# Altium PCB Keyboard_V0.1.PcbDoc (part 3 of 4)
Units mil, origin at the board's own origin, x right, y up, seen from the top; angles counter-clockwise.
Board outline 5480.32 x 4193.11 mil, 2 copper layers (Top Layer, Bottom Layer); 162 components, 142 nets, 755 pads, 487 vias.
Unrouted connection lines stored in the file: 1.
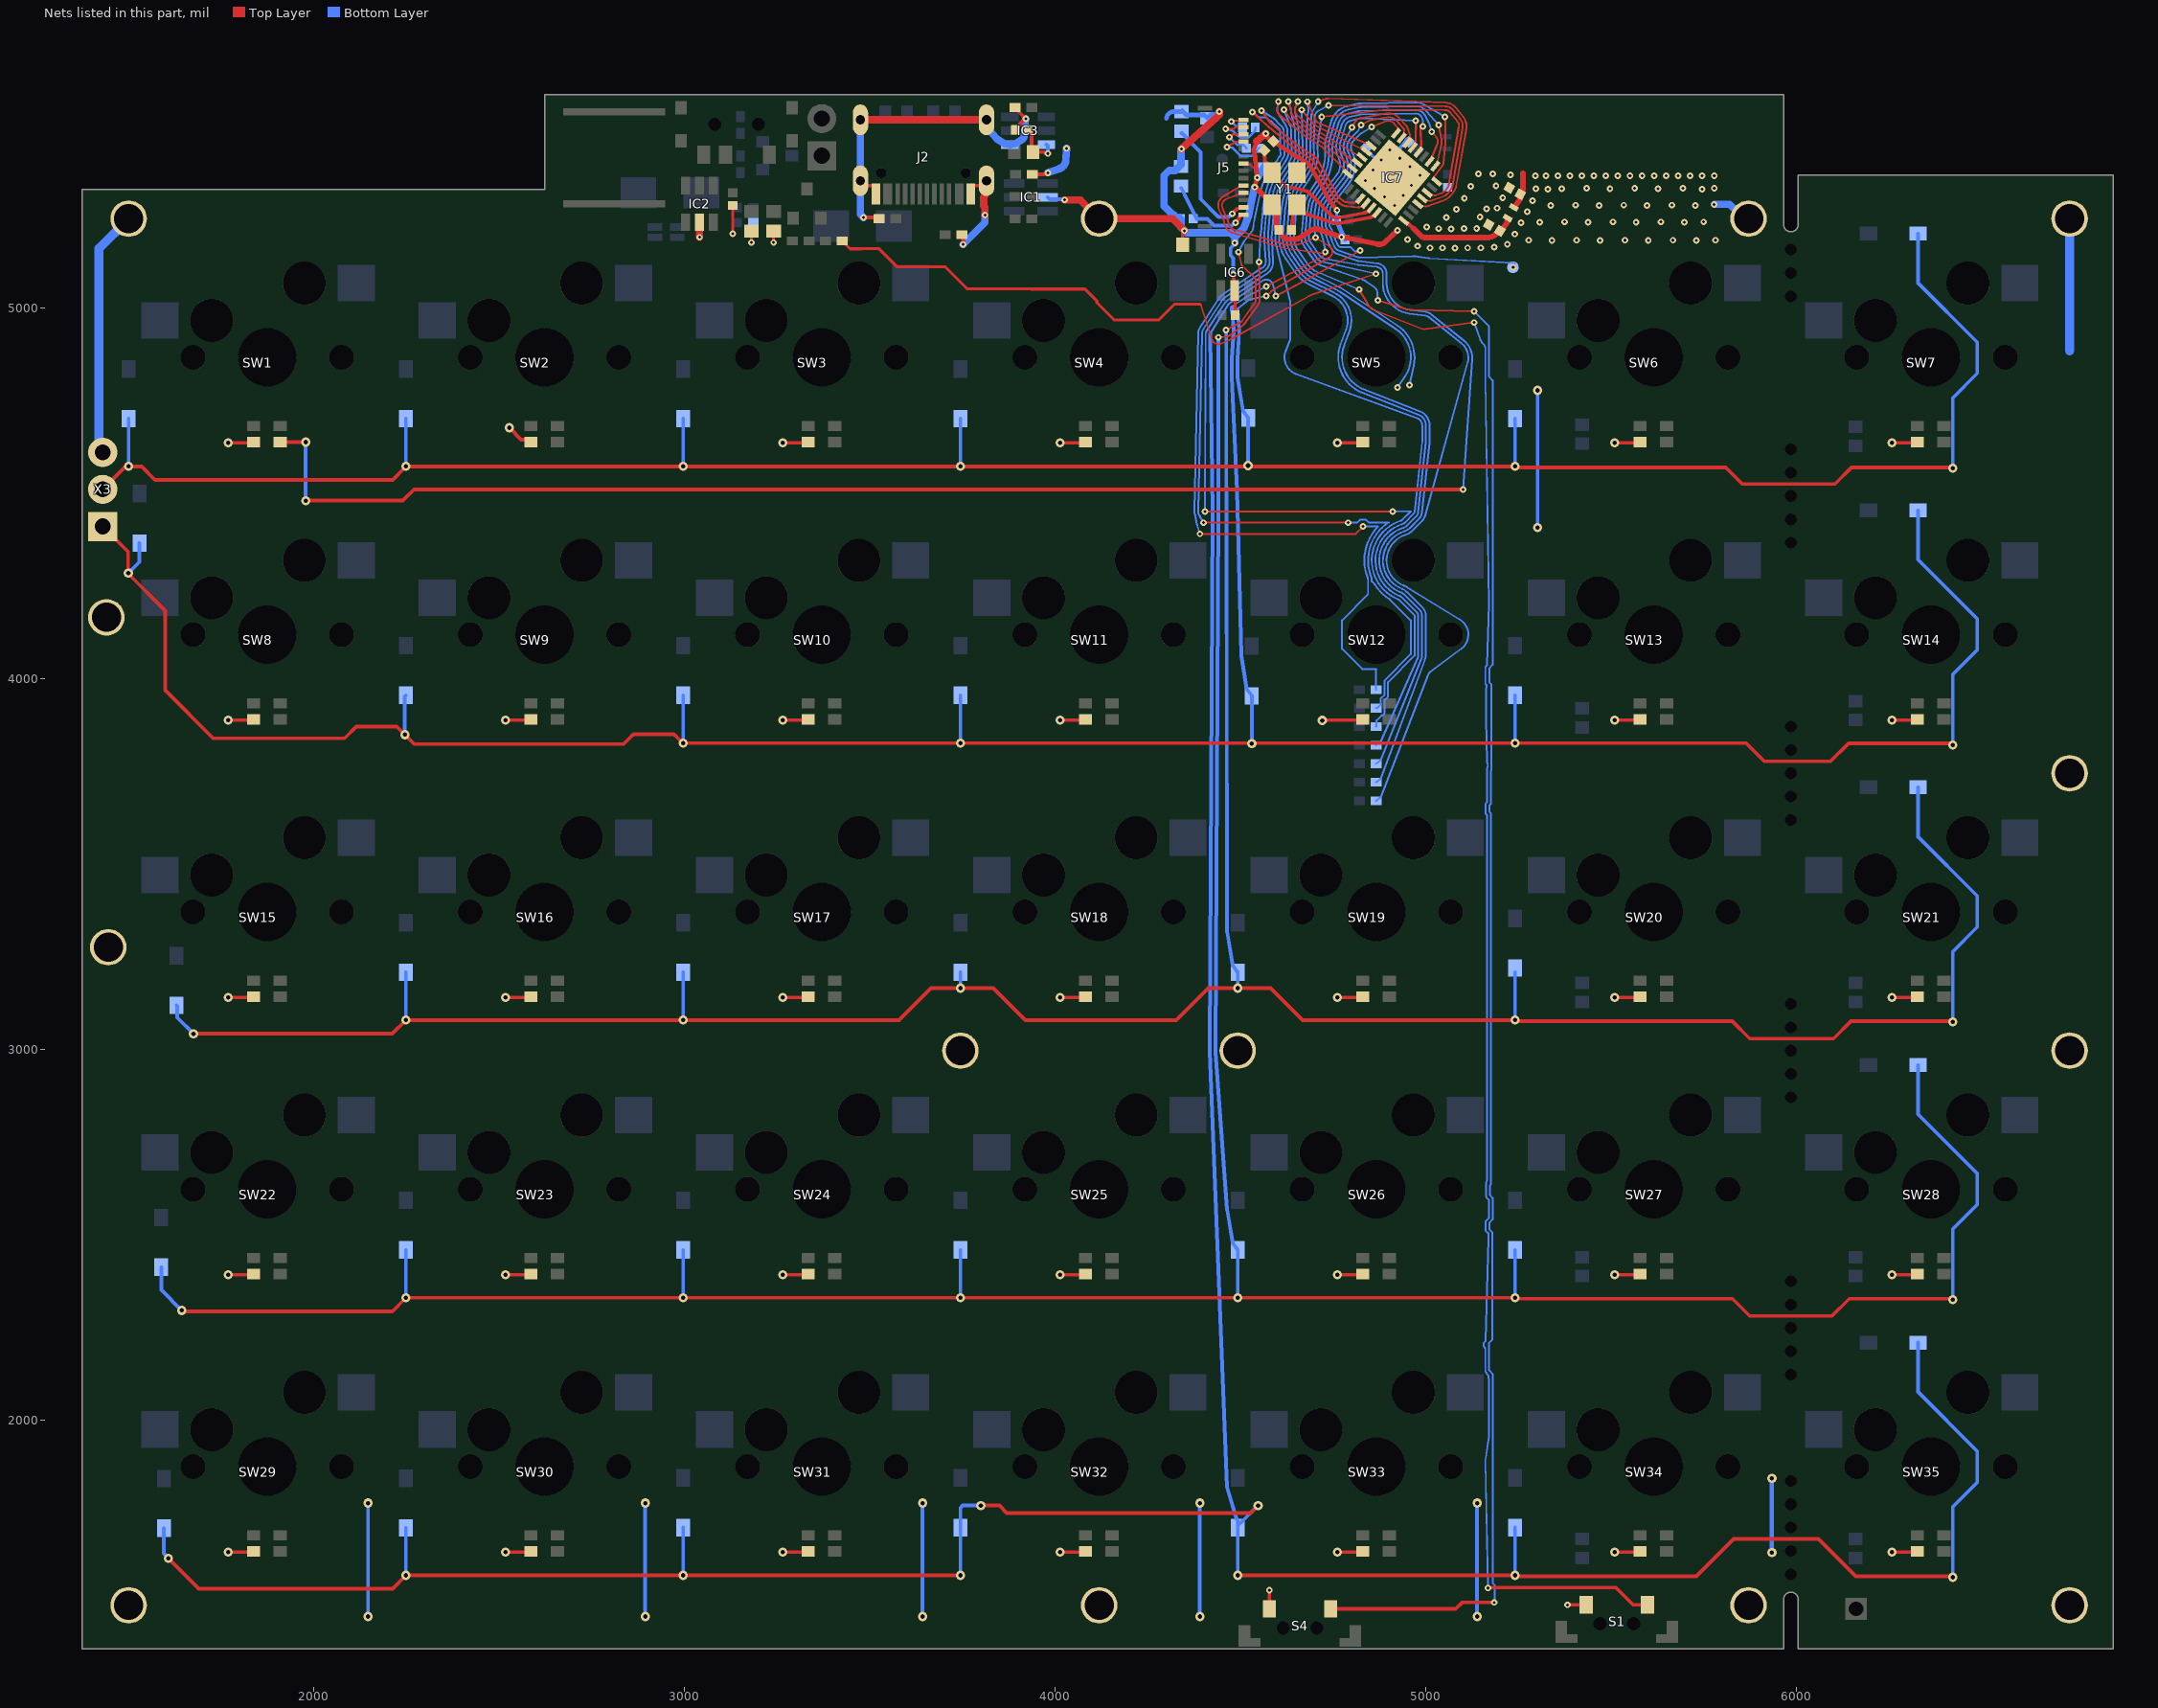
[diagram p2: the nets of this part, all layers, seen from the top]

## Via types
v1: diameter 25, hole 12, Top Layer to Bottom Layer, tented both sides, 244 vias
v2: diameter 17.72, hole 7.87, Top Layer to Bottom Layer, tented both sides, 242 vias
v3: diameter 17.72, hole 7.87, Top Layer to Bottom Layer, 1 vias

## Nets (pads, with @x,y where several pads share a name; then routed paths per layer and width w, separated by ;. In a path a pad name is that pad's centre, name@x,y a point inside that pad or via, vN(x,y) a via of type N, cw(c..) or ccw(c..) an arc to the next point about the centre after c; other vN are vias at no path point) (continued)
GND: C2.1 C3.1 C4.1 C5.1 C6.1 C7.1 C10.1 C11.1 C12.1 C13.1 C14.2 C15.2 C16.1 C17.1 C18.1 C19.1 C20.1 C21.1 C23.1 IC1.2 IC2.2 IC3.1 IC6.2 IC7.33 J2.A1B12 J2.B1A12 J2.S1 J2.S2 J2.S3 J2.S4 J5.7 MH1.0 MH2.0 MH3.0 MH4.0 MH5.0 MH6.0 MH7.0 MH8.0 MH9.0 MH10.0 MH11.0 MH12.0 MH13.0 MH14.0 R6.2 R20.1 R22.1 R23.2 R24.2 R26.1 S1.1 S4.1 SW1.2 SW2.2 SW3.2 SW4.2 SW5.2 SW6.2 SW7.2 SW8.2 SW9.2 SW10.2 SW11.2 SW12.2 SW13.2 SW14.2 SW15.2 SW16.2 SW17.2 SW18.2 SW19.2 SW20.2 SW21.2 SW22.2 SW23.2 SW24.2 SW25.2 SW26.2 SW27.2 SW28.2 SW29.2 SW30.2 SW31.2 SW32.2 SW33.2 SW34.2 SW35.2 X3.3 Y1.2 Y1.4 | length 10152.6
  Top Layer w6: J5.7@4507.87,5388.78 4510.3,5386.35 4525.86,5386.35 4541.4,5370.81
  Top Layer w8: v2(3130,5200) C2.1@3130,5270 ; v2(3180,5175.75) C3.1@3180,5206.85 ; v2(3240,5175.78) C4.1@3240,5206.85 ; C7.1@4343.43,5170 4343.43,5200.2 ; IC6.2@4484,5046.79 4484.65,5023.23 C6.1@4484.65,4980
  Top Layer w10: v1(1768.9,1643.47) 1835,1643.47 SW29.2@1836.93,1645.4 ; v1(1768.9,2391.5) 1835,2391.5 SW22.2@1836.93,2393.43 ; v1(1768.9,3139.53) 1835,3139.53 SW15.2@1836.93,3141.46 ; v1(1768.9,3887.56) 1835,3887.56 SW8.2@1836.93,3889.49 ; v1(1768.9,4635.59) 1835,4635.59 SW1.2@1836.93,4637.52 ; v1(2516.93,1643.47) 2583.03,1643.47 SW30.2@2584.96,1645.4 ; v1(2516.93,2391.5) 2583.03,2391.5 SW23.2@2584.96,2393.43 ; v1(2516.93,3139.53) 2583.03,3139.53 SW16.2@2584.96,3141.46 ; v1(2516.93,3887.56) 2583.03,3887.56 SW9.2@2584.96,3889.49 ; v1(2527.21,4676.13) 2559.03,4644.31 2578.18,4644.31 SW2.2@2584.96,4637.52 ; v1(3264.96,1643.47) 3331.06,1643.47 SW31.2@3332.99,1645.4 ; v1(3264.96,2391.5) 3331.06,2391.5 SW24.2@3332.99,2393.43 ; v1(3264.96,3139.53) 3331.06,3139.53 SW17.2@3332.99,3141.46 ; v1(3264.96,3887.56) 3331.06,3887.56 SW10.2@3332.99,3889.49 ; v1(3264.96,4635.59) 3331.06,4635.59 SW3.2@3332.99,4637.52 ; J2.S2@3473.92,5344.43 3473.92,5343.85 3488.4,5329.38 3509.24,5329.38 3516.05,5322.57 J2.B1A12@3516.05,5308.41 ; v2(3482.65,5243.33) R24.2@3521.47,5243.33 ; v2(3750.95,5170.65) 3750.89,5170.7 3750.89,5199.71 R23.2@3750.95,5199.76 ; J2.A1B12@3771.95,5308.41 3771.95,5322.57 3778.76,5329.38 3799.6,5329.38 J2.S1@3813.41,5343.18 ; R22.1@3882.01,5533.19 R22.1@3888.82,5540 ; R22.1@3891.77,5540 3894.72,5540 3901.54,5533.19 3901.54,5528.46 v2(3920,5510) 3918.06,5510 3904.8,5496.74 3904.8,5494.8 3898.78,5488.78 3898.78,5486.81 C5.1@3891.97,5480 ; R6.2@3941.18,5360 3970,5360 3972.59,5362.59 3978.52,5362.59 v2(3980,5364.06) ; v1(4012.99,1643.47) 4079.09,1643.47 SW32.2@4081.02,1645.4 ; v1(4012.99,2391.5) 4079.09,2391.5 SW25.2@4081.02,2393.43 ; v1(4012.99,3139.53) 4079.09,3139.53 SW18.2@4081.02,3141.46 ; v1(4012.99,3887.56) 4079.09,3887.56 SW11.2@4081.02,3889.49 ; v1(4012.99,4635.59) 4079.09,4635.59 SW4.2@4081.02,4637.52 ; v2(4480,5090) 4481.91,5069.35 IC6.2@4484,5046.79 ; S4.1@4577.32,1490.04 v2(4577.32,1540.66) ; v1(4720,3886.69) 4720.87,3887.56 4827.12,3887.56 SW12.2@4829.06,3889.49 ; v1(4761.02,1643.47) 4827.12,1643.47 SW33.2@4829.06,1645.4 ; v1(4761.02,2391.5) 4827.12,2391.5 SW26.2@4829.06,2393.43 ; v1(4761.02,3139.53) 4827.12,3139.53 SW19.2@4829.06,3141.46 ; v1(4761.02,4635.59) 4827.12,4635.59 SW5.2@4829.06,4637.52 ; v2(5381.43,1501.18) S1.1@5432.05,1501.18 ; v1(5509.06,1643.47) 5575.15,1643.47 SW34.2@5577.09,1645.4 ; v1(5509.06,2391.5) 5575.15,2391.5 SW27.2@5577.09,2393.43 ; v1(5509.06,3139.53) 5575.15,3139.53 SW20.2@5577.09,3141.46 ; v1(5509.06,3887.56) 5575.15,3887.56 SW13.2@5577.09,3889.49 ; v1(5509.06,4635.59) 5575.15,4635.59 SW6.2@5577.09,4637.52 ; v1(6257.09,1643.47) 6323.19,1643.47 SW35.2@6325.12,1645.4 ; v1(6257.09,2391.5) 6323.19,2391.5 SW28.2@6325.12,2393.43 ; v1(6257.09,3139.53) 6323.19,3139.53 SW21.2@6325.12,3141.46 ; v1(6257.09,3887.56) 6323.19,3887.56 SW14.2@6325.12,3889.49 ; v1(6257.09,4635.59) 6323.19,4635.59 SW7.2@6325.12,4637.52
  Top Layer w12: v2(4537.59,5325.41) v2(4544.88,5350.54) ; 4541.4,5370.81 4543.14,5360.68 4539.43,5397.08 cw(c4551.37,5398.25) 4539.37,5398.2 4539.37,5405.87 ccw(c4527.37,5405.87) 4538.98,5408.92 4535.52,5422.09 cw(c4546.16,5424.88) 4535.84,5428.69 4542.19,5445.89 cw(c4553.44,5441.71) 4542.21,5445.94 4543.31,5448.82 ; 4570.22,5460 4582.2,5452.43 C14.2@4587.92,5448.82 4593.53,5445.1 4652.9,5405.71 cw(c4652.34,5393.73) 4658.55,5404 4671.07,5396.43 4681.1,5390.37 cw(c4674.89,5380.1) 4685.24,5386.18 ; 4685.24,5386.17 4709.68,5344.29 cw(c4699.32,5338.24) 4709.85,5343.99 4714.55,5335.39 4730.58,5306.03 ; 4730.59,5306.01 ccw(c4741.11,5311.78) 4730.66,5305.89 4739.75,5289.76 ccw(c4778.07,5311.37) 4743.28,5284.44 v2(4759.67,5263.27)
  Top Layer w15: v2(4537.59,5325.41) 4568.52,5297.62 4597.52,5264.68 C15.2@4597.52,5215.66 ; C15.2@4602.68,5210 4606.99,5204.9 4614.6,5191.3 ccw(c4625.51,5197.4) 4625.51,5184.9 4649.13,5184.9 ccw(c4649.13,5197.4) 4655.91,5186.9 4689.42,5208.53 cw(c4702.13,5188.84) 4709.34,5211.14 4770.45,5191.39 ccw(c4775.06,5205.67) 4772.34,5190.92 v2(4772.36,5190.91) cw(c4769.72,5176.15) 4772.66,5190.86 4869.43,5171.53 ccw(c4874.02,5194.51) 4890.1,5177.45 v2(4923.23,5208.66)
  Top Layer w20: v2(3040,5190) IC2.2@3040,5230.79 ; J2.S4@3474,5507 3763.96,5507 3764.23,5507.27 3813.88,5507.27 J2.S3@3814.16,5507 ; v2(3810,5250) 3810,5271.55 3806.46,5275.09 3806.46,5296.57 3807.07,5297.19 3807.07,5299.59 3810.07,5302.59 3810.07,5338.35 J2.S1@3814.16,5342.43 ; v2(4025.03,5290.78) 4067.4,5290.78 MH8.0@4118.03,5240.16 4316.06,5240.16 v2(4348.41,5207.81) ; v2(4340,5428) 4435.34,5513.99 4441.56,5520.22 4442.18,5520.84 v2(4442.18,5529.3) ; 4543.31,5448.82 v2(4567.58,5469.7)
  Bottom Layer w8: v2@4339,5427 v2(4340,5428) ; C12.1@4758.27,5236.22 4758.71,5244.82 v2(4759.67,5263.27)
  Bottom Layer w10: v1(2145.67,1469.68) v1(2145.67,1775.59) ; v1(2893.7,1469.68) v1(2893.7,1775.59) ; v1(3641.73,1469.68) v1(3641.73,1775.59) ; IC1.2@3979.28,5298 3985.01,5292.26 4023.55,5292.26 v2(4025.03,5290.78) ; v1(4389.76,1469.68) v1(4389.76,1775.59) ; v2(4480,5090) 4480,5134.04 4472.72,5141.33 4472.72,5161.17 4484.23,5172.68 v2(4484.23,5174.76) ; C12.1@4751.46,5228.75 C12.1@4752.5,5229.79 ; C23.1@4832.5,5426 4838.76,5426 4864.17,5400.59 4871.97,5400.59 4872.4,5400.16 4877.86,5400.16 v2(4879.33,5398.69) ; v2(4929.25,5403.05) 4929.25,5431.55 4947.65,5449.96 C20.1@4947.65,5453.92 ; v1(5137.8,1469.68) v1(5137.8,1775.59) ; v1(5301.02,4406.93) v1(5301.02,4776.93)
  Bottom Layer w12: 4300,5510 cw(c4319.09,5510) 4319.09,5529.09 C17.1@4340,5529.09 ; C17.1@4342.46,5531.56 4354.14,5519.88 4401.3,5519.88 R26.1@4410,5511.18 4420.73,5521.91 4433.25,5521.91 4440.64,5529.3 v2(4442.18,5529.3) ; C12.1@4758.27,5236.22 4761.18,5229.62 4776.49,5194.89 4777.29,5193.09 4778.57,5190.18 C11.1@4781.48,5183.59 ; v1(5933.07,1641.73) v1(5933.07,1842.52)
  Bottom Layer w20: J2.S4@3478.08,5502.92 J2.S4@3474,5507 J2.S2@3474,5342.43 3474,5251.98 v2(3482.65,5243.33) ; v2(3750.95,5170.65) 3810,5229.7 v2(3810,5250) ; J2.S3@3814.16,5507 3814.16,5486.33 3842.81,5455.4 ccw(c3853.82,5465.59) 3845.95,5452.82 3863.82,5441.81 IC3.1@3877.44,5440 3891.06,5441.81 3908.93,5452.82 ccw(c3901.06,5465.59) 3916.01,5464.28 v2(3920,5510) ; v2(3980,5364.06) 4010.88,5374.99 ccw(c4002.23,5399.44) 4028.12,5397.93 v2(4030,5430) ; C18.1@4327.85,5241.97 4320.13,5249.69 4318.17,5249.69 4293.44,5274.41 4293.44,5356.05 4307.8,5370.4 4323.41,5370.4 4339,5385.99 v2@4339,5427 ; C18.1@4335.29,5241.97 4338.91,5238.35 4338.91,5217.3 v2(4348.41,5207.81) 4353.9,5202.31 4417.69,5202.31 4418,5202 4472.51,5202 4484,5190.51 ; v2(4484.23,5174.76) 4484,5190.51 ; v2(4537.59,5325.41) 4527.29,5276.56 cw(c4507.72,5280.69) 4527.27,5276.45 4521.43,5249.57 cw(c4501.89,5253.81) 4520.59,5246.74 4508.66,5215.17 4484,5190.51 ; v2(4544.88,5350.54) 4556.72,5368.42 ccw(c4540.01,5379.4) 4557.38,5369.48 cw(c4744.49,5263.58) 4561.59,5376.59 4567.74,5386.57 ; v2(5777.49,5278.76) 5819.15,5278.76 5857.75,5240.16 MH12.0@5870.08,5240.16
  Bottom Layer w25: X3.3@1430,4610 1420,4620 1420,5160.16 MH7.0@1500,5240.16 ; 6736.22,4883.78 MH6.0@6736.22,5240.16
  other v2: 5077.76,5160.43 5010.83,5161.42 5044.29,5161.42 5112.2,5161.42 5147.64,5161.43 5184.06,5163.39 4977.49,5166.51 5219.49,5171.26 5339.57,5181.1 5469.49,5181.1 5599.41,5181.1 5729.33,5181.1 5276.57,5182.09 5406.5,5182.09 5536.42,5182.09 5666.34,5182.09 5780.51,5182.09 4949.8,5184.06 5239.17,5198.82 5034.44,5213.26 5067.95,5212.78 5102.67,5213.74 5136.67,5213.99 5001.4,5218.08 5255.91,5229.33 5307.09,5230.31 5437.01,5230.31 5566.93,5230.31 5696.85,5230.31 5374.02,5231.3 5503.94,5231.3 5633.86,5231.3 5749.02,5231.3 5055.12,5243.11 5145.67,5245.08 5272.64,5258.86 5081.69,5265.75 5163.39,5266.73 5191.93,5268.7 4915.21,5276.07 5336.61,5275.59 5466.54,5275.59 5596.46,5275.59 5726.38,5275.59 5403.54,5276.57 5533.46,5276.57 5663.39,5276.57 5287.4,5288.39 5103.35,5295.28 5206.69,5296.26 4888.07,5298.85 4937.99,5303.22 5328.74,5319.88 5745.08,5319.88 5296.26,5320.87 5366.14,5320.87 5496.06,5320.87 5625.98,5320.87 4860.92,5321.62 5433.07,5321.85 5562.99,5321.85 5692.91,5321.85 5777.56,5321.85 5121.06,5327.76 5188.57,5328.33 4960.76,5330.36 4836.74,5343.3 5295.28,5356.3 5323.82,5356.3 5355.31,5356.3 5387.8,5356.3 5420.28,5356.3 5452.76,5356.3 5485.24,5356.3 5517.72,5356.3 5550.2,5356.3 5582.68,5356.3 5615.16,5356.3 5647.64,5356.3 5680.12,5356.3 5712.6,5356.3 5745.08,5356.3 5777.56,5356.3 4983.54,5357.5 5227.79,5358.33 5141.73,5361.22 5179.85,5361.18 4856.56,5371.54 4956.4,5380.28 4902.11,5425.83
GPIO0: IC7.4 | length 1691.8
  Top Layer w5: v2(4708.97,5556.14) 4730.63,5563.52 cw(c4736.57,5546.06) 4737.23,5564.49 5052.59,5553.23 cw(c5051.22,5514.82) 5081.12,5538.96 5100.51,5514.84 cw(c5070.6,5490.7) 5108.47,5484.09 5081.25,5328.22 cw(c5044.31,5334.67) 5073.07,5310.6 5065.45,5301.51 cw(c5036.72,5325.62) 5049.22,5290.26 5001.26,5273.31 cw(c4998.76,5280.38) 4997.69,5272.96 4990.18,5274.04 IC7.4@4977.84,5279.95
  Bottom Layer w5: v2(4708.97,5556.14) 4693.61,5529.01 ccw(c4718.36,5515) 4689.94,5515.92 4687.35,5437.55 ccw(c4821.78,5433.1) 4687.54,5424.69 4687.85,5419.74 cw(c4603.02,5414.45) 4675.54,5370.12 4666.63,5355.55 cw(c4594.08,5399.83) 4664.86,5352.76 4652.51,5334.07 ccw(c4759.67,5263.27) 4632.64,5282.25 4630.25,5266.21 ccw(c4746.46,5248.82) 4629.38,5258.82 4623.98,5195.51 ccw(c4702.13,5188.84) 4637.58,5144.28 4663.89,5106.17 ccw(c4728.44,5150.73) 4693.76,5080.37 4756.98,5049.22 cw(c4716.14,4966.14) 4767.48,5043.17 4917.42,4943.55 cw(c4866.14,4866.14) 4942.49,4813.31 v2(4922.61,4784.57)
GPIO1: IC7.5 | length 1607.5
  Top Layer w5: v2(4736.57,5546.06) 5051.47,5543.25 cw(c5051.22,5514.82) 5073.32,5532.71 5092.72,5508.58 cw(c5070.6,5490.7) 5098.62,5485.81 5071.4,5329.94 cw(c5044.31,5334.67) 5065.41,5317.03 ; IC7.5@4990.49,5295.03 5002.83,5289.12 5010.34,5288.04 ccw(c5011.41,5295.46) 5013.91,5288.39 5045.89,5299.69 ccw(c5036.72,5325.62) 5057.79,5307.94 5065.4,5317.02
  Bottom Layer w5: v2(4736.57,5546.06) 4709.47,5531.15 ccw(c4718.36,5515) 4699.93,5515.56 4697.35,5437.27 ccw(c4821.78,5433.1) 4697.52,5425.3 4697.83,5420.37 cw(c4603.02,5414.45) 4684.07,5364.9 4675.14,5350.29 cw(c4594.08,5399.83) 4673.22,5347.28 4660.85,5328.55 ccw(c4759.67,5263.27) 4642.54,5280.77 4640.14,5264.73 ccw(c4746.46,5248.82) 4639.35,5257.96 4633.94,5194.66 ccw(c4702.13,5188.84) 4645.81,5149.96 4672.12,5111.85 ccw(c4728.44,5150.73) 4698.19,5089.34 4761.48,5058.15 cw(c4716.14,4966.14) 4772.9,5051.57 4923.06,4951.81 cw(c4866.14,4866.14) 4966.55,4843.85 v2(4954.91,4791.46)
GPIO2: IC7.6 S1.2 | length 5453.2
  Top Layer w5: v2(4718.36,5515) 4894.05,5533.92 cw(c4899.24,5485.76) 4899.54,5534.2 5051.33,5533.25 cw(c5051.22,5514.82) 5065.65,5526.29 5084.91,5502.33 cw(c5070.6,5490.7) 5088.77,5487.53 5061.55,5331.66 cw(c5044.31,5334.67) 5057.75,5323.46 5050.13,5314.37 cw(c5036.72,5325.62) 5042.55,5309.12 5026.57,5303.47 cw(c5024.07,5310.54) 5023,5303.12 5015.48,5304.2 IC7.6@5003.15,5310.11 ; v2(4819.52,5049.16) 4845.57,5005.44 ccw(c4870,5020) 4859.67,4993.5 4989.01,4943.09 ccw(c4995.7,4960.27) 4998.2,4942 v2(5130,4960)
  Top Layer w10: v2(5167.03,1546.52) 5168.16,1547.66 5512.34,1547.66 5558.82,1501.18 S1.2@5597.4,1501.18
  Bottom Layer w5: v2(4718.36,5515) 4708.56,5450.21 ccw(c4821.78,5433.1) 4707.5,5425.96 4707.81,5420.99 cw(c4603.02,5414.45) 4692.61,5359.69 4683.67,5345.07 cw(c4594.08,5399.83) 4681.58,5341.78 4669.2,5323.04 ccw(c4759.67,5263.27) 4652.42,5279.28 4650.02,5263.21 ccw(c4746.46,5248.82) 4649.31,5257.11 4643.91,5193.81 ccw(c4702.13,5188.84) 4654.06,5155.61 4680.32,5117.56 ccw(c4728.44,5150.73) 4705.84,5096.84 v2(4819.52,5049.16) ; v2(5130,4960) 5147.02,4913.2 ccw(c5151.71,4914.94) 5147.25,4912.68 5149.37,4908.55 ccw(c5153.8,4910.88) 5149.48,4908.35 cw(c5115.12,4887.87) 5150.42,4906.68 ccw(c5154.81,4909.07) 5151.22,4905.59 5156.02,4900.63 cw(c5146.16,4890.96) 5159.98,4890.96 5159.98,4878 5160,4810.04 ; 5160,4810 5170,4200.12 cw(c5165,4200.04) 5170,4199.88 5164.76,4037.68 cw(c5159.77,4037.84) 5163.3,4034.31 5160,4031.01 5160,3985.86 5161.46,3984.39 cw(c5157.93,3980.86) 5162.93,3980.7 5162.53,3968.31 ccw(c5167.52,3968.15) 5162.52,3968.15 5162.52,3890.04 5164.19,3775.86 ccw(c5169.18,3775.99) 5164.62,3773.94 cw(c5146.02,3765.33) 5164.86,3757.25 ccw(c5169.47,3755.31) 5164.47,3755.34 5164.47,3665.48 5160.52,3661.53 5160.52,3636.26 5164.47,3632.32 5164.47,2646.54 cw(c5159.47,2646.54) 5163.84,2644.1 5163.16,2642.89 ccw(c5167.52,2640.45) 5162.52,2640.45 5162.52,2602.07 ccw(c5167.52,2602.07) 5163.97,2598.55 5168.55,2593.97 cw(c5165,2590.45) 5170,2590.45 5170,2544.95 5160.52,2535.47 5160.52,2510.2 5167.38,2503.34 5168.52,2502.2 5168.52,2488.33 5160.69,2214.33 cw(c5155.7,2214.47) 5159.23,2210.94 5155,2206.7 5155,2198.42 5158.57,2194.85 cw(c5155.04,2191.31) 5160,2191.91 5160,2129.93 5163.6,2126.33 5163.6,2124.64 5167.01,2121.23 cw(c5163.47,2117.69) 5168.44,2118.3 5170,2105 5170,1955 5160.07,1890.43 ; 5160.06,1890.42 ccw(c5165.01,1889.67) 5160.01,1889.58 v2(5167.03,1546.52)
GPIO3: IC7.8 S4.2 | length 5389.2
  Top Layer w5: v2(4870,5020) 4944.63,4996.83 ccw(c4966.14,5066.14) 4964.57,4993.59 v2(5130,4990) ; IC7.8@5028.45,5340.27 5020.49,5351.39 5045.53,5385.73 ccw(c5039.46,5390.13) 5046.93,5389.46 5051.91,5444.62 ccw(c5013.63,5448.08) 5052.06,5447.98 5052.17,5490.75 cw(c5070.6,5490.7) 5052.2,5491.89 ccw(c5033.81,5493.11) 5052.22,5494 v2(5051.22,5514.82)
  Top Layer w10: S4.2@4742.68,1490.04 5080.04,1490.04 5097.56,1507.56 v2(5183.61,1507.56)
  Bottom Layer w5: v2(4870,5020) 4868.39,5041.39 ccw(c4850.01,5040.01) 4860.59,5055.1 4835.84,5072.45 ccw(c4819.52,5049.16) 4828.66,5076.09 4716.08,5114.33 cw(c4728.44,5150.73) 4696.76,5128.96 4670.55,5166.93 cw(c4702.13,5188.84) 4663.83,5192.11 4669.24,5255.41 cw(c4746.46,5248.82) 4669.81,5260.26 4672.2,5276.32 cw(c4759.67,5263.27) 4685.88,5312.02 4698.32,5330.84 ccw(c4594.08,5399.83) 4700.74,5334.64 4709.65,5349.22 ccw(c4603.02,5414.45) 4727.77,5422.24 4727.46,5427.17 cw(c4821.78,5433.1) 4731.42,5460.76 4744.62,5503.82 cw(c4800.48,5486.67) 4787.01,5543.53 4811.67,5549.37 cw(c4825.07,5492.49) 4824.21,5550.92 4971.71,5553.33 cw(c4972.5,5504.9) 4997.04,5546.66 v2(5051.22,5514.82) ; v2(5130,4990) 5170,4950 5170,4814.14 5180,4804.14 5180,4036.87 5170.52,4027.39 5170.52,3989.48 5176.52,3983.48 5176.52,3753.25 5174.47,3751.2 5174.47,3661.33 5170.52,3657.39 5170.52,3640.41 5174.47,3636.46 5174.47,2634.47 5172.52,2632.52 5172.52,2606.21 5180,2598.74 5180,2540.8 5170.52,2531.33 5170.52,2514.34 5178.52,2506.34 5178.52,2216.08 5170,2207.56 5170,2134.07 5180,2124.07 5180,1559.62 5185.46,1554.16 5185.46,1509.41 v2(5183.61,1507.56)
GPIO4: IC7.9 R3.2 | length 2658.1
  Top Layer w5: 4390,5010 4391.47,5008.53 cw(c4387.93,5005) 4392.69,5006.54 4422.45,4914.34 ccw(c4440,4920) 4447.59,4903.2 4471.7,4914.08 ccw(c4460,4940) 4473.75,4915.11 4681.04,5029.66 cw(c4716.14,4966.14) 4693.46,5035.08 v2(4865.13,5091.56) ; IC7.9@5024.81,5381.87 5030.72,5394.2 5041.38,5441.87 ccw(c5013.63,5448.08) 5041.54,5453.52 v2(5033.81,5493.11)
  Top Layer w8: R3.2@3425.28,5180 3428.23,5180 3436.04,5172.19 3436.04,5169.24 3446.33,5158.95 3477.8,5158.95 3478.74,5159.89 3523.24,5159.89 3573.13,5110 3703.13,5110 3762.13,5051 3934.26,5051 3935.04,5050.23 4079.77,5050.23 4112.2,5017.8 4112.2,5013.33 4158.46,4967.07 4279.12,4967.07 4322.05,5010 4390,5010
  Bottom Layer w5: v2(4865.13,5091.56) 4722.33,5122.95 cw(c4728.44,5150.73) 4704.98,5134.65 4678.78,5172.61 cw(c4702.13,5188.84) 4673.8,5191.26 4679.2,5254.56 cw(c4746.46,5248.82) 4679.7,5258.78 4682.09,5274.85 cw(c4759.67,5263.27) 4694.23,5306.5 4706.68,5325.36 ccw(c4594.08,5399.83) 4709.27,5329.43 4718.2,5344.04 ccw(c4603.02,5414.45) 4737.75,5422.85 4737.45,5427.76 cw(c4821.78,5433.1) 4740.99,5457.87 4754.16,5500.82 cw(c4800.48,5486.67) 4789.32,5533.8 4813.97,5539.64 cw(c4825.07,5492.49) 4824.4,5540.92 4971.81,5543.33 cw(c4972.5,5504.9) 5001.46,5530.17 v2(5033.81,5493.11)
GPIO5: IC7.10 R35.2 | length 2763.8
  Top Layer w5: IC7.10@5009.73,5394.52 5015.64,5406.86 5030.5,5440.65 ccw(c5013.63,5448.08) 5027.77,5459.91 v2(5015.38,5474.71)
  Bottom Layer w5: R35.2@4865.28,3670 4877.54,3679.31 5005.57,4009.8 cw(c5022.76,4003.14) 5011.76,4017.94 5094.75,4079.62 ccw(c5066.14,4118.11) 5091.04,4159.1 4947.07,4246.9 ccw(c4923.64,4208.48) 4940.39,4250.25 4939.22,4250.72 cw(c4966.14,4318.11) 4944.13,4387.26 4945.54,4387.71 ccw(c4931.77,4430.56) 4963.59,4398.74 4987.43,4422.57 ccw(c4959.14,4450.86) 4997.69,4440.16 5112.35,4853.32 ccw(c5066.14,4866.14) 5096.09,4903.6 5007.22,4974.67 ccw(c4995.7,4960.27) 4998.15,4978.54 4955.18,4984.3 cw(c4966.14,5066.14) 4883.57,5066.14 4883.57,5091.56 ccw(c4865.13,5091.56) 4867.24,5109.88 4817.51,5115.75 cw(c4822.02,5153.92) 4815.1,5116.11 4725.12,5132.59 cw(c4728.44,5150.73) 4713.21,5140.33 4687.01,5178.29 cw(c4702.13,5188.84) 4683.76,5190.41 4689.17,5253.71 cw(c4746.46,5248.82) 4689.59,5257.31 4691.98,5273.37 cw(c4759.67,5263.27) 4702.57,5300.99 4715.06,5319.9 ccw(c4594.08,5399.83) 4717.83,5324.25 4726.74,5338.83 ccw(c4603.02,5414.45) 4747.73,5423.47 4747.43,5428.35 cw(c4821.78,5433.1) 4750.55,5454.94 4763.74,5497.96 cw(c4800.48,5486.67) 4791.62,5524.07 4816.28,5529.91 cw(c4825.07,5492.49) 4824.58,5530.92 4971.94,5533.33 cw(c4972.5,5504.9) 4997.84,5517.8 5008.14,5497.58 cw(c4991.71,5489.22) 5009.35,5494.58 v2(5015.38,5474.71)
GPIO6/SDA: D1.1 D2.1 D3.1 D4.1 D5.1 D6.1 D7.1 IC7.12 J5.11 X3.2 | length 8280.8
  Top Layer w5: J5.11@4507.87,5310.04 4496.59,5306.63 4461.22,5293.22 ccw(c4467.75,5275.98) 4450.84,5268.64 4460.72,5245.9 ccw(c4477.63,5253.24) 4461.15,5244.97 cw(c4423.23,5225.79) 4463.96,5237.91 4468.17,5223.77 ccw(c4485.84,5229.03) 4480.64,5211.34 4617.75,5171.02 ccw(c4625.51,5197.4) 4625.51,5169.9 4649.13,5169.9 ccw(c4649.13,5197.4) 4659.27,5171.84 v2(4702.13,5188.84) 4738.19,5166.38 cw(c4728.44,5150.73) 4737.65,5134.76 4586.02,5047.26 ccw(c4595.24,5031.29) 4582.26,5044.39 v2(4569.15,5031.29)
  Top Layer w6: IC7.12@4979.57,5419.83 4985.54,5431.46 4987,5439.28 ccw(c4979.14,5440.75) 4987.13,5441.16 v2@4984.81,5486.2
  Top Layer w10: X3.2@1430,4510 1489.03,4569.03 1497.13,4569.03 v1(1500,4571.9) 1534.9,4571.9 1570.9,4535.9 2212.03,4535.9 v1(2248.03,4571.9) v1(2996.06,4571.9) v1(3744.09,4571.9) v1(5240.16,4571.9) 5242.66,4569.4 5808.56,4569.4 5853.58,4524.37 6103.11,4524.37 6148.14,4569.4 6418.4,4569.4 v1(6420.9,4566.9)
  Bottom Layer w5: 4491.3,4994.6 cw(c4496.3,4994.6) 4493.17,4998.5 4521.5,5021.2 cw(c4526.19,5015.35) 4524.77,5022.71 v2(4569.15,5031.29) ; v2(4702.13,5188.84) 4699.18,5219 cw(c4746.46,5223.62) 4698.96,5223.62 4698.96,5248.82 cw(c4746.46,5248.82) 4699.48,5255.83 4701.88,5271.9 cw(c4759.67,5263.27) 4713.34,5298.88 4760.71,5360.55 ccw(c4733.04,5381.98) 4767.97,5379.8 ccw(c4364.73,5402.58) 4768.28,5386.19 ccw(c4733.31,5387.53) 4764.7,5403 4763.94,5404.55 cw(c4821.78,5433.1) 4760.12,5452.03 4773.27,5494.94 cw(c4800.48,5486.67) 4793.93,5514.34 4818.54,5520.17 cw(c4825.07,5492.49) 4824.75,5520.93 4972.09,5523.33 cw(c4972.5,5504.9) 4990.92,5505.78 v2(4991.71,5489.22)
  Bottom Layer w10: v1(1500,4571.9) D1.1@1500,4700.79 ; v1(2248.03,4571.9) D2.1@2248.03,4700.79 ; v1(2996.06,4571.9) D3.1@2996.06,4700.79 ; v1(3744.09,4571.9) D4.1@3744.09,4700.79 ; 4491.3,4994.6 4491.48,4992.17 ccw(c4501.45,4992.89) 4491.48,4992.06 4495.8,4943.16 cw(c4460,4940) 4495.87,4937.87 4491.32,4861.14 ccw(c4501.3,4860.55) 4491.3,4860.55 4491.3,4813.31 ccw(c4501.3,4813.31) 4491.43,4811.68 4506.3,4721.69 D5.1@4520,4703.07 4520,4684.45 v1(4520,4574.18) ; v1(5240.16,4571.9) D6.1@5240.16,4700.79 ; D7.1@6327.15,5199.72 6327.15,5066.64 6486.9,4906.9 6486.9,4822.9 6420.9,4756.9 v1(6420.9,4566.9)
GPIO7/SCL: D8.1 D9.1 D10.1 D11.1 D12.1 D13.1 D14.1 IC7.13 J5.10 X3.1 | length 9359.6
  Top Layer w5: J5.10@4507.87,5329.72 4496.59,5326.32 4453.19,5300.41 ccw(c4467.75,5275.98) 4441.67,5264.65 4451.55,5241.91 4452.2,5240.52 cw(c4423.23,5225.79) 4454.4,5234.98 4458.59,5220.92 ccw(c4485.84,5229.03) 4477.76,5201.77 4614.98,5161.41 ccw(c4625.51,5197.4) 4620.68,5160.21 4722.71,5146.97 4723,5146.93 ccw(c4723.65,5151.89) 4726.93,5148.12 v2@4726.03,5146.56 ; v2(4569.15,5057.35) 4720.13,5138.14 ccw(c4717.77,5142.55) 4722.06,5139.97 v2@4726.03,5146.56 ; v2@4728.49,5150.62 v2@4726.03,5146.56 ; v2@4728.52,5150.65 v2(4728.44,5150.73) ; v2@4726.03,5146.56 v2(4728.44,5150.73) ; v2@4726.03,5146.56 v2(4728.44,5150.73)
  Top Layer w6: IC7.13@4964.49,5432.48 4970.46,5444.11 4971.92,5451.93 ccw(c4964.06,5453.4) 4972.06,5453.33 v2(4972.5,5504.9)
  Top Layer w10: X3.1@1430,4410 1498.59,4341.41 1498.59,4282.78 1598.43,4182.94 1598.43,3968.5 1728.35,3838.58 2082.68,3838.58 2114.17,3870.08 2223.49,3870.08 v1(2245.21,3848.35) 2270.73,3822.83 2834.65,3822.83 2858.01,3846.2 cw(c2865.08,3839.13) 2865.08,3849.13 2967.74,3849.13 cw(c2967.74,3839.13) 2974.81,3846.2 2995.45,3825.56 v1(2996.06,3825.56) v1(3744.09,3825.56) v1(5240.16,3825.56) 5863.41,3825.56 5912.64,3776.34 6091.3,3776.34 6136.95,3821.99 cw(c6144.02,3814.91) 6144.02,3824.91 6412.4,3824.91 cw(c6412.4,3814.91) 6419.46,3822 v1(6420.9,3820.56)
  Bottom Layer w5: 4476.3,5000.82 cw(c4481.3,5000.82) 4478.54,5004.98 4516.58,5029.98 cw(c4526.19,5015.35) 4518.13,5030.88 v2(4569.15,5057.35) ; v2(4728.44,5150.73) 4724.85,5169.5 4720.2,5192.49 ccw(c4702.13,5188.84) 4717.89,5198.4 4714.39,5204.17 cw(c4746.46,5223.62) 4708.96,5223.62 4708.96,5248.82 cw(c4746.46,5248.82) 4709.37,5254.35 4711.77,5270.42 cw(c4759.67,5263.27) 4721.27,5292.79 4768.65,5354.46 ccw(c4733.04,5381.98) 4777.95,5379.12 ; 4777.96,5379.22 ccw(c4364.73,5402.58) 4778.27,5385.75 ccw(c4733.31,5387.53) 4773.68,5407.4 4772.92,5408.94 cw(c4821.78,5433.1) 4769.69,5449.14 4782.85,5492.05 cw(c4800.48,5486.67) 4796.23,5504.61 4820.82,5510.43 cw(c4825.07,5492.49) 4825.83,5510.91 v2(4972.5,5504.9)
  Bottom Layer w10: v1(1499.38,4284.31) 1529.08,4314.01 D8.1@1529.08,4364.73 ; v1(2245.21,3848.35) 2245.02,3848.54 2245.02,3951.44 D9.1@2248.03,3954.45 ; v1(2996.06,3825.56) D10.1@2996.06,3954.45 ; v1(3744.09,3825.56) D11.1@3744.09,3954.45 ; 4476.3,5000.82 4476.3,4994.6 ccw(c4501.3,4994.6) 4476.4,4992.41 4480.85,4941.9 cw(c4460,4940) 4480.9,4938.7 4476.34,4862.03 ccw(c4501.3,4860.55) 4476.3,4860.55 4476.3,4813.31 ccw(c4501.3,4813.31) 4476.32,4812.19 4489.97,4507.26 cw(c4460,4505.92) 4489.99,4506.63 4501.3,4063.05 ccw(c4511.3,4063.31) 4501.43,4061.68 4516.3,3971.69 D12.1@4530,3953.07 4530,3934.45 v1(4530,3824.18) ; v1(5240.16,3825.56) D13.1@5240.16,3954.45 ; D14.1@6327.15,4453.38 6327.15,4320.31 6486.9,4160.56 6486.9,4076.56 6420.9,4010.56 v1(6420.9,3820.56)
GPIO8/PWM: IC7.14 SW1.3 | length 4829
  Top Layer w5: v2(4800.48,5486.67) 4809.08,5501.66 cw(c4825.07,5492.49) 4821.74,5510.62 4892.3,5523.57 cw(c4899.24,5485.76) 4927.72,5511.58 4946.87,5490.46 cw(c4933.9,5478.71) 4950.4,5484.54 4956.05,5468.55 cw(c4948.98,5466.05) 4956.4,5464.98 4955.32,5457.47 IC7.14@4949.41,5445.13
  Top Layer w10: SW1.3@1908.98,4637.52 v1(1977.52,4637.52) ; v1(1978.04,4479.62) 2239.62,4479.62 2270,4510 v2(5100,4510)
  Bottom Layer w5: v2(4800.48,5486.67) 4782.8,5454.57 ccw(c4821.78,5433.1) 4781.9,5413.34 4782.67,5411.78 cw(c4733.31,5387.53) 4788.26,5385.31 cw(c4364.73,5402.58) 4787.93,5378.53 4787.91,5378.19 cw(c4733.04,5381.98) 4776.6,5348.4 4729.2,5286.7 ccw(c4759.67,5263.27) 4721.66,5268.94 4719.26,5252.88 ccw(c4746.46,5248.82) 4718.96,5248.82 4718.96,5223.62 ccw(c4746.46,5223.62) 4722.96,5209.33 4726.42,5203.64 cw(c4702.13,5188.84) 4728.93,5198.35 4736.14,5178.05 ccw(c4772.36,5190.91) 4737.6,5174.51 4744.8,5159.25 ccw(c4769.67,5170.99) 4760.7,5144.99 4812.75,5127.04 ccw(c4822.02,5153.92) 4818.69,5125.68 4868.47,5119.8 cw(c4865.13,5091.56) 4893.57,5091.56 4893.57,5066.14 ccw(c4966.14,5066.14) 4956.54,4994.21 4999.48,4988.46 cw(c4995.7,4960.27) 5013.46,4982.48 5102.34,4911.41 cw(c5066.14,4866.14) 5123.97,4862.21 v2(5100,4510)
  Bottom Layer w10: v1(1977.52,4637.52) 1977.52,4480.14 v1(1978.04,4479.62)
GPIO9/BOOT: IC7.15 pad.8@5234.33,5109.07 | length 1022.2
  Top Layer w5: v2(4825.07,5492.49) 4844.49,5503.41 cw(c4853.53,5487.33) 4850.11,5505.45 4893.98,5513.71 cw(c4899.24,5485.76) 4920.31,5504.86 4939.46,5483.74 cw(c4933.9,5478.71) 4941.32,5477.64 4940.24,5470.12 IC7.15@4934.33,5457.78
  Bottom Layer w5: v2(4825.07,5492.49) 4816.48,5477.5 cw(c4800.48,5486.67) 4813.52,5473.63 4797.44,5457.55 ccw(c4821.78,5433.1) 4790.88,5417.75 4791.65,5416.19 cw(c4733.31,5387.53) 4798.25,5384.79 cw(c4364.73,5402.58) 4797.92,5377.96 cw(c4787.93,5378.53) 4797.91,5377.84 4797.89,5377.5 cw(c4733.04,5381.98) 4784.56,5342.35 4737.13,5280.6 ccw(c4759.67,5263.27) 4731.55,5267.47 4729.15,5251.4 ccw(c4746.46,5248.82) 4728.96,5248.82 4728.96,5223.62 ccw(c4746.46,5223.62) 4731.5,5214.54 4734.99,5208.78 cw(c4702.13,5188.84) 4738.35,5201.7 4745.56,5181.4 ccw(c4772.36,5190.91) 4746.64,5178.78 4753.84,5163.52 ccw(c4769.67,5170.99) 4763.96,5154.44 4816.01,5136.49 ccw(c4822.02,5153.92) 4822.43,5135.49 4964.51,5138.69 cw(c4966.14,5066.14) 4978.6,5137.63 ccw(c4980.24,5147.5) 4978.71,5137.62 5006.47,5133.32 ccw(c5010.83,5161.42) 5009.22,5133.03 5234.96,5120.28 5235.64,5120.25 pad.8@5240,5120 ; pad.8@5234.33,5109.07 v3(5235.01,5109.07)
GPIO10: D29.1 D30.1 D31.1 D32.1 D33.1 D34.1 D35.1 IC7.16 | length 10902.1
  Top Layer w5: v2(4595.24,5031.29) v2(4822.02,5153.92) ; v2(4853.53,5487.33) 4892.39,5502.88 cw(c4899.24,5485.76) 4913.68,5497.23 4925.16,5482.78 IC7.16@4919.25,5470.44
  Top Layer w10: v1(1606.89,1626.93) 1689.14,1544.67 2212.03,1544.67 v1(2248.03,1580.67) v1(2996.06,1580.67) v1(3744.09,1580.67) ; v1(3798.9,1768.9) 3848.9,1768.9 3868.9,1748.9 4526.93,1748.9 v1(4546.93,1768.9) ; v1(4492.13,1580.67) v1(5240.16,1580.67) 5242.66,1578.17 5728.9,1578.17 5829.54,1678.81 6058.98,1678.81 6159.62,1578.17 6418.4,1578.17 v1(6420.9,1575.67)
  Bottom Layer w5: 4418.07,4930 4465.65,5007.36 cw(c4476.3,5000.82) 4469.22,5011.12 4558.72,5072.55 cw(c4569.15,5057.35) 4586.96,5062.13 v2(4595.24,5031.29) ; v2(4822.02,5153.92) 4811.47,5151.56 cw(c4810.38,5156.44) 4810.38,5151.44 4808.31,5151.44 4796.26,5163.49 4769.67,5163.49 cw(c4769.67,5170.99) 4762.88,5167.8 4755.7,5183.01 cw(c4772.36,5190.91) 4754.98,5184.74 4747.78,5205.05 ccw(c4702.13,5188.84) 4743.54,5213.96 4740.04,5219.73 cw(c4746.46,5223.62) 4738.96,5223.62 4738.96,5248.82 cw(c4746.46,5248.82) 4739.04,5249.93 4741.44,5265.99 cw(c4759.67,5263.27) 4745.06,5274.51 4792.52,5336.29 ccw(c4733.04,5381.98) 4807.86,5376.81 4807.89,5377.15 ccw(c4787.93,5378.53) 4807.9,5377.39 ccw(c4364.73,5402.58) 4808.24,5384.39 ccw(c4733.31,5387.53) 4800.61,5420.64 4799.85,5422.17 cw(c4821.78,5433.1) 4804.5,5450.47 4821.21,5467.17 cw(c4838.48,5449.8) 4825.91,5470.83 v2(4853.53,5487.33)
  Bottom Layer w10: D29.1@1595,1708.07 1595,1640.29 1606.89,1628.4 v1(1606.89,1626.93) ; v1(2248.03,1580.67) D30.1@2248.03,1708.66 ; v1(2996.06,1580.67) D31.1@2996.06,1709.56 ; v1(3744.09,1580.67) D32.1@3744.09,1709.56 3744.09,1758.9 3744.09,1763.04 3749.95,1768.9 v1(3798.9,1768.9) ; 4418.07,4930 4418.07,4927.17 ccw(c4428.07,4927.17) 4418.07,4927.03 4424.71,4450.13 cw(c4403.77,4449.84) 4424.71,4449.67 4416.69,2996.48 ccw(c4491.9,2996.06) 4416.74,2993.07 4463.43,1819.37 ccw(c4473.42,1819.8) 4463.82,1817.02 4489.08,1732.97 4492.13,1728.18 D33.1@4492.13,1709.56 4492.13,1690.94 v1(4492.13,1580.67) ; D33.1@4492.13,1714.48 4505.83,1728.18 ccw(c4499.21,1735.68) 4506.24,1728.57 v1(4546.93,1768.9) ; v1(5240.16,1580.67) D34.1@5240.16,1709.56 ; D35.1@6327.15,2208.49 6327.15,2075.42 6486.9,1915.67 6486.9,1831.67 6420.9,1765.67 v1(6420.9,1575.67)
GPIO12: IC7.19 R34.2 | length 2421.8
  Top Layer w5: v2(4680.37,5555.62) 4701.48,5507.58 ccw(c4718.36,5515) 4711.07,5498.07 4840.01,5442.55 IC7.19@4852.35,5436.64
  Bottom Layer w5: v2(4680.37,5555.62) 4682.67,5535.74 cw(c4664.35,5533.63) 4682.27,5529.29 4681,5524.04 ccw(c4718.36,5515) 4679.94,5516.27 4677.36,5437.86 ccw(c4821.78,5433.1) 4677.56,5424.1 4677.87,5419.12 cw(c4603.02,5414.45) 4667.01,5375.33 4658.07,5360.72 cw(c4594.08,5399.83) 4656.51,5358.26 4644.16,5339.58 ccw(c4759.67,5263.27) 4622.75,5283.72 4620.36,5267.68 ccw(c4746.46,5248.82) 4619.42,5259.67 4614.01,5196.36 ccw(c4702.13,5188.84) 4629.35,5138.6 4655.66,5100.49 ccw(c4728.44,5150.73) 4689.34,5071.4 4752.5,5040.28 cw(c4716.14,4966.14) 4793.55,4937.41 4779.09,4898.44 ccw(c4866.14,4866.14) 4832.37,4779.65 4983.87,4720.49 cw(c4969.13,4682.76) 5009.63,4682.76 5009.63,4639.46 cw(c4969.13,4639.46) 5009.4,4635.07 4988.97,4447.61 cw(c4959.14,4450.86) 4980.35,4429.64 4956.55,4405.84 cw(c4931.77,4430.56) 4942.47,4397.23 4941.04,4396.77 ccw(c4966.14,4318.11) 4935.47,4241.45 4936.67,4240.97 cw(c4923.64,4208.48) 4948.36,4233.26 4990.28,4191.34 cw(c4968.99,4170.2) 4998.99,4170.2 4998.99,4061.37 cw(c4968.99,4061.37) 4997.11,4050.91 4877.54,3729.31 R34.2@4865.28,3720
GPIO13: IC7.20 R33.2 | length 2339.7
  Top Layer w5: v2(4664.35,5533.63) 4696.93,5496.3 ccw(c4718.36,5515) 4705.43,5489.67 4827.36,5427.47 IC7.20@4839.7,5421.56
  Bottom Layer w5: v2(4664.35,5533.63) 4666.09,5479.61 cw(c4601.12,5477.52) 4666.1,5479.12 4667.32,5429.3 ccw(c4821.78,5433.1) 4667.58,5423.47 4667.88,5418.6 cw(c4603.02,5414.45) 4658.45,5380.51 4649.59,5366.01 cw(c4594.08,5399.83) 4648.15,5363.75 4635.82,5345.09 ccw(c4759.67,5263.27) 4612.86,5285.15 4610.47,5269.16 ccw(c4746.46,5248.82) 4609.46,5260.52 4604.05,5197.22 ccw(c4702.13,5188.84) 4621.12,5132.92 4647.43,5094.81 ccw(c4728.44,5150.73) 4684.92,5062.43 4748.03,5031.33 cw(c4716.14,4966.14) 4784.16,4940.85 4769.72,4901.92 ccw(c4866.14,4866.14) 4828.73,4770.34 4980.16,4711.2 cw(c4969.13,4682.76) 4999.63,4682.76 4999.63,4639.46 cw(c4969.13,4639.46) 4999.45,4636.15 4979.02,4448.69 cw(c4959.14,4450.86) 4973.28,4436.72 4949.45,4412.88 cw(c4931.77,4430.56) 4939.42,4406.75 4937.94,4406.28 ccw(c4966.14,4318.11) 4931.72,4232.18 4932.89,4231.71 cw(c4923.64,4208.48) 4941.27,4226.21 4983.17,4184.31 cw(c4968.99,4170.2) 4988.99,4170.2 4988.99,4061.37 cw(c4968.99,4061.37) 4987.56,4053.93 4877.54,3779.31 R33.2@4865.28,3770
GPIO14: IC7.21 R32.2 | length 2380.3
  Top Layer w5: v2(4653.96,5556.14) 4647.41,5540.91 ccw(c4664.35,5533.63) 4652.65,5519.38 4693.79,5485.44 ccw(c4718.36,5515) 4698.59,5482.04 4814.71,5412.39 IC7.21@4827.04,5406.48
  Bottom Layer w5: v2(4653.96,5556.14) 4647.41,5540.91 ccw(c4664.35,5533.63) 4646.31,5529.83 4654.94,5488.86 cw(c4601.12,5477.52) 4656.11,5478.77 4657.33,5429.04 ccw(c4821.78,5433.1) 4657.6,5422.85 4657.92,5417.74 cw(c4603.02,5414.45) 4649.9,5385.7 4641.07,5371.25 cw(c4594.08,5399.83) 4639.8,5369.26 4627.48,5350.6 ccw(c4759.67,5263.27) 4602.97,5286.63 4600.58,5270.64 ccw(c4746.46,5248.82) 4599.49,5261.37 4594.09,5198.07 ccw(c4702.13,5188.84) 4597.03,5162.16 4633.85,5017.2 cw(c4626.58,5015.35) 4634.08,5015.35 4634.08,4916.93 cw(c4626.58,4916.93) 4633.55,4914.17 4621.54,4883.77 ccw(c4666.14,4866.14) 4649.71,4821.08 4976.16,4702.02 cw(c4969.13,4682.76) 4989.63,4682.76 4989.63,4639.46 cw(c4969.13,4639.46) 4989.51,4637.23 4969.08,4449.77 cw(c4959.14,4450.86) 4966.21,4443.79 4942.38,4419.95 cw(c4931.77,4430.56) 4936.41,4416.29 4934.81,4415.78 ccw(c4966.14,4318.11) 4927.97,4222.91 4929.23,4222.4 cw(c4923.64,4208.48) 4934.2,4219.14 4976.1,4177.24 cw(c4968.99,4170.2) 4978.99,4170.2 4978.99,4061.37 cw(c4968.99,4061.37) 4978.14,4057.33 4877.54,3829.31 R32.2@4865.28,3820
GPIO15: IC7.22 R31.2 | length 2735
  Top Layer w5: v2(4403.77,4449.84) 4909.84,4449.84 v2(4910,4450) ; v2(4628.31,5556.14) 4633.95,5540.29 cw(c4616.58,5534.11) 4634.71,5537.48 4636.39,5528.43 ccw(c4664.35,5533.63) 4646.27,5511.68 4687.43,5477.72 ccw(c4718.36,5515) 4693.31,5473.54 4721.25,5456.66 cw(c4674.89,5380.1) 4728.15,5452.03 4802.05,5397.31 IC7.22@4814.39,5391.4
  Bottom Layer w5: v2(4403.77,4449.84) 4405.57,4930.05 cw(c4418.07,4930) 4407.6,4936.84 4457.47,5013.13 cw(c4476.3,5000.82) 4463.57,5019.37 4553.06,5080.79 cw(c4569.15,5057.35) 4554.26,5081.58 4569.27,5090.8 ccw(c4549.15,5123.55) 4587.51,5126.03 4583.94,5181.2 cw(c4702.13,5188.84) 4584.12,5198.92 4589.53,5262.22 cw(c4746.46,5248.82) 4590.69,5272.11 4593.09,5288.21 cw(c4759.67,5263.27) 4619.13,5356.11 4631.46,5374.77 ccw(c4594.08,5399.83) 4632.55,5376.49 4641.36,5390.89 ccw(c4603.02,5414.45) 4647.92,5417.4 4647.62,5422.23 cw(c4821.78,5433.1) 4647.33,5428.79 4646.11,5478.63 ccw(c4601.12,5477.52) 4645.13,5486.93 4636.52,5527.77 cw(c4664.35,5533.63) 4636.39,5528.43 4634.71,5537.48 ccw(c4616.58,5534.11) 4633.95,5540.29 v2(4628.31,5556.14) ; R31.2@4865.28,3870 4866.38,3871.11 4866.38,3886.38 4880.69,3900.69 4883.15,3900.69 4887.54,3905.08 4887.54,3940.94 4897.54,3950.94 4897.54,3989.91 4968.99,4061.37 4968.99,4170.2 4927.17,4212.03 4927.12,4212.07 ccw(c4923.64,4208.48) 4925.5,4213.12 4924.24,4213.63 cw(c4966.14,4318.11) 4931.71,4425.28 4933.3,4425.79 ccw(c4931.77,4430.56) 4935.29,4427 4959.14,4450.86 4910.86,4450.86 v2(4910,4450)
GPIO16: IC7.23 R30.2 | length 2572.6
  Top Layer w5: v2(4400,4420) v2(4790,4420) ; v2(4616.58,5534.11) 4633.19,5511.12 ccw(c4664.35,5533.63) 4639.89,5503.98 4681.06,5470.01 ccw(c4718.36,5515) 4688.19,5464.95 4716.08,5448.1 cw(c4674.89,5380.1) 4725.99,5441 4792.14,5385.5 IC7.23@4801.74,5376.32
  Bottom Layer w5: v2(4400,4420) 4387.87,4440.52 cw(c4403.77,4449.84) 4385.34,4450.24 4395.57,4930.48 cw(c4418.07,4930) 4399.23,4942.31 4449.09,5018.6 cw(c4476.3,5000.82) 4457.91,5027.61 4547.42,5089.05 cw(c4569.15,5057.35) 4549.03,5090.1 4564,5099.29 ccw(c4549.15,5123.55) 4577.53,5125.37 4573.96,5180.56 cw(c4702.13,5188.84) 4574.16,5199.77 4579.56,5263.07 cw(c4746.46,5248.82) 4580.8,5273.59 4583.2,5289.68 cw(c4759.67,5263.27) 4610.79,5361.62 4623.12,5380.28 ccw(c4594.08,5399.83) 4624.03,5381.72 4632.81,5396.09 ccw(c4603.02,5414.45) 4637.94,5416.8 4637.64,5421.62 cw(c4821.78,5433.1) 4637.33,5428.54 4636.11,5478.5 ccw(c4601.12,5477.52) 4633.72,5490.26 v2(4616.58,5534.11) ; v2(4790,4420) 4813.93,4420 4822.36,4428.44 4837.64,4428.44 4845.16,4420.92 4899.4,4420.92 ccw(c4966.14,4318.11) 4853.18,4270.54 cw(c4848.57,4268.6) 4853.57,4268.6 4853.57,4261.99 4861.45,4254.11 4861.49,4254.07 cw(c4857.9,4250.59) 4862.12,4253.27 4862.69,4252.37 ccw(c4966.14,4318.11) 4900.4,4214.66 4901.3,4214.09 cw(c4898.62,4209.87) 4902.1,4213.46 4902.14,4213.42 4958.99,4156.57 4958.99,4065.51 4887.54,3994.06 4887.54,3955.08 4877.54,3945.08 4877.54,3929.31 4868.23,3920 R30.2@4865.28,3920
GPIO17: IC7.24 R29.2 | length 2582.7
  Top Layer w5: v2(4390,4390) 4810,4390 v2(4830,4410) ; v2(4601.82,5556.14) 4598.44,5537.38 ccw(c4616.58,5534.11) 4604.88,5519.87 4674.72,5462.28 ccw(c4718.36,5515) 4683,5456.41 4710.88,5439.55 cw(c4674.89,5380.1) 4723.94,5429.34 4781.12,5372.37 IC7.24@4789.08,5361.24
  Bottom Layer w5: v2(4390,4390) 4382.39,4414.54 cw(c4400,4420) 4381.98,4416.1 4375.98,4443.83 cw(c4403.77,4449.84) 4375.34,4450.45 4385.57,4930.69 cw(c4418.07,4930) 4390.86,4947.78 4440.72,5024.07 cw(c4476.3,5000.82) 4452.25,5035.85 4541.78,5097.31 cw(c4569.15,5057.35) 4543.79,5098.62 4558.74,5107.8 ccw(c4549.15,5123.55) 4567.54,5124.79 4563.98,5179.91 cw(c4702.13,5188.84) 4564.2,5200.62 4569.6,5263.92 cw(c4746.46,5248.82) 4570.9,5275.02 4573.31,5291.16 cw(c4759.67,5263.27) 4602.45,5367.14 4614.77,5385.8 ccw(c4594.08,5399.83) 4615.5,5386.93 4624.28,5401.29 ccw(c4603.02,5414.45) 4627.96,5416.18 4627.66,5420.99 cw(c4821.78,5433.1) 4627.34,5428.3 4626.12,5478.02 ccw(c4601.12,5477.52) 4622.21,5490.95 4601.03,5524.21 cw(c4616.58,5534.11) 4598.44,5537.38 v2(4601.82,5556.14) ; v2(4830,4410) 4870.01,4410 4870.31,4409.71 ccw(c4966.14,4318.11) 4842.58,4270.08 4843.23,4268.4 cw(c4838.57,4266.59) 4843.57,4266.65 ; 4843.57,4266.62 4843.57,4226.85 4773.29,4156.57 4773.29,4079.65 4827.68,4025.26 4866.14,4025.26 4865.28,4024.39 R29.2@4865.28,3970
GPIO20: D22.1 D23.1 D24.1 D25.1 D26.1 D27.1 D28.1 IC7.27 | length 9910.9
  Top Layer w5: v2(4440,4920) 4461.39,4921.62 ccw(c4460,4940) 4471.38,4925.49 4507.26,4953.63 ccw(c4496.46,4967.4) 4510.73,4957.28 4547.49,5009.1 ccw(c4533.21,5019.23) 4550.71,5019.23 4550.71,5074.35 ccw(c4533.21,5074.35) 4550.7,5074.91 v2(4549.15,5123.55)
  Top Layer w6: v2(4555.95,5531.64) 4574.99,5504.71 ccw(c4616.58,5534.11) 4584.19,5494.8 4654.08,5437.17 ccw(c4718.36,5515) 4666.15,5428.61 4694.06,5411.75 cw(c4674.89,5380.1) 4706.85,5398.74 4731.25,5356.92 cw(c4699.32,5338.24) 4731.72,5356.11 4761.39,5302.28 ccw(c4778.07,5311.37) 4765.81,5296.86 4774.91,5289.23 ccw(c4787.12,5303.78) 4785.2,5284.88 4801.35,5283.18 ccw(c4802.2,5291.13) 4805.02,5283.64 4812.46,5286.44 IC7.27@4822.88,5294.34
  Top Layer w10: v1(1643.1,2295.37) 1645.45,2293.02 2211.6,2293.02 v1(2248.03,2329.45) v1(2996.06,2329.45) v1(3744.09,2329.45) v1(4492.13,2329.45) v1(5240.16,2329.45) 5242.66,2326.95 5826.6,2326.95 5873.27,2280.28 6095.24,2280.28 6141.91,2326.95 6418.4,2326.95 v1(6420.9,2324.45)
  Bottom Layer w5: v2(4549.15,5123.55) 4554,5198.44 cw(c4702.13,5188.84) 4554.23,5201.47 4559.64,5264.77 cw(c4746.46,5248.82) 4561.01,5276.5 4563.42,5292.63 cw(c4759.67,5263.27) 4594.1,5372.65 4606.43,5391.31 cw(c4614.77,5385.8) 4606.48,5391.38 ccw(c4594.08,5399.83) 4606.96,5392.14 4615.74,5406.51 ccw(c4603.02,5414.45) 4617.97,5415.55 4617.67,5420.37 cw(c4821.78,5433.1) 4617.34,5428.05 4616.12,5477.78 ccw(c4601.12,5477.52) 4611.7,5488.16 4606.33,5493.52 ; v2(4555.95,5531.64) 4572.31,5521.44 ; 4572.33,5521.42 4587.09,5512.22 cw(c4579.15,5499.49) 4589.76,5510.1 4606.3,5493.55
  Bottom Layer w10: D22.1@1588,2412.07 1588,2350.47 v1(1643.1,2295.37) ; v1(2248.03,2329.45) D23.1@2248.03,2458.34 ; v1(2996.06,2329.45) D24.1@2996.06,2458.34 ; v1(3744.09,2329.45) D25.1@3744.09,2458.34 ; v2(4440,4920) 4439.71,4449.82 cw(c4403.77,4449.84) 4439.71,4449.64 4431.69,2996.43 ccw(c4491.9,2996.06) 4431.85,2991.59 4463.45,2567.83 ccw(c4473.42,2568.57) 4463.56,2566.94 4478.42,2476.96 D26.1@4492.13,2458.34 4492.13,2439.71 v1(4492.13,2329.45) ; v1(5240.16,2329.45) D27.1@5240.16,2458.34 ; D28.1@6327.15,2957.26 6327.15,2824.19 6486.9,2664.45 6486.9,2580.45 6420.9,2514.45 v1(6420.9,2324.45)
GPIO21: D15.1 D16.1 D17.1 D18.1 D19.1 D20.1 D21.1 IC7.28 | length 9116
  Top Layer w5: v2(4460,4940) 4499.92,4960.75 ccw(c4496.46,4967.4) 4502.57,4963.06 4539.33,5014.89 ccw(c4533.21,5019.23) 4540.71,5019.23 4540.71,5074.35 ccw(c4533.21,5074.35) 4538.39,5079.77 4504.41,5112.23 cw(c4509.59,5117.65) 4502.32,5115.81 v2(4493.65,5150)
  Top Layer w6: v2(4531.5,5527.56) 4575.04,5488.18 ccw(c4616.58,5534.11) 4577.18,5486.33 4647.12,5428.66 ccw(c4718.36,5515) 4660.46,5419.2 4688.34,5402.35 cw(c4674.89,5380.1) 4697.35,5393.2 4721.77,5351.35 cw(c4699.32,5338.24) 4722.09,5350.79 4751.77,5296.94 4751.82,5296.86 ccw(c4778.07,5311.37) 4758.73,5288.44 4767.84,5280.8 ccw(c4787.12,5303.78) 4784.04,5273.94 4816.44,5270.52 ccw(c4817.28,5278.48) 4820.1,5270.99 4827.54,5273.78 IC7.28@4837.96,5281.68
  Top Layer w10: v1(1674.79,3041.5) 2211.16,3041.5 v1(2248.03,3078.37) v1(2996.06,3078.37) 3578.37,3078.37 3664.81,3164.81 v1(3744.05,3164.81) 3832.98,3164.81 3919.43,3078.37 4326.4,3078.37 4412.85,3164.81 v1(4492.13,3164.81) 4581.01,3164.81 4667.46,3078.37 v1(5240.16,3078.37) 5242.66,3075.87 5825.71,3075.87 5873.27,3028.31 6099.17,3028.31 6146.74,3075.87 6418.4,3075.87 v1(6420.9,3073.37)
  Bottom Layer w5: v2(4493.65,5150) 4509.82,5179.68 cw(c4514.21,5177.28) 4510.21,5180.28 4533.32,5210.94 cw(c4741.32,5197.45) 4534.66,5224.66 cw(c4741.32,5197.45) 4537.66,5241.83 4551.46,5305.36 cw(c4744.49,5263.58) 4555.23,5320.04 cw(c4744.49,5263.58) 4562.92,5341.3 ccw(c4558.32,5343.25) 4563.32,5343.25 4563.32,5345.09 cw(c4568.32,5345.09) 4564.16,5347.87 4571.66,5359.21 ccw(c4567.49,5361.97) 4571.85,5359.51 cw(c4744.49,5263.58) 4586.46,5382.04 cw(c4744.49,5263.58) 4588.42,5384.62 cw(c4744.49,5263.58) 4589.71,5386.26 4598,5396.73 ccw(c4594.08,5399.83) 4598.37,5397.26 4604.82,5408 cw(c4664.85,5372.01) 4607.14,5411.62 ccw(c4603.02,5414.45) 4607.99,5414.97 ; v2(4531.5,5527.56) 4540.07,5521.67 ; 4540.08,5521.66 cw(c4537.21,5517.56) 4541.2,5520.58 ccw(c4555.95,5531.64) 4559.81,5513.61 cw(c4560.83,5508.71) 4560.79,5513.71 4564.37,5513.71 cw(c4564.37,5508.71) 4567.01,5512.95 4581.79,5503.73 cw(c4579.15,5499.49) 4582.68,5503.03 4599.25,5486.46 cw(c4595.71,5482.93) 4600.32,5484.86 ; 4600.35,5484.85 cw(c4598.39,5480.25) 4601.93,5483.79 4604.66,5481.06 cw(c4601.12,5477.52) 4606.12,5477.52 4606.12,5449.25 ccw(c4616.12,5449.25) 4606.12,5449.03 4606.51,5431.03 ccw(c4656.5,5432.1) 4606.53,5430.41 ; 4606.53,5430.37 4606.56,5429.5 ccw(c4656.53,5431.23) 4606.59,5428.85 ccw(c4626.57,5429.71) 4606.6,5428.52 ccw(c4671.5,5432.18) 4606.92,5424.77 ccw(c4636.74,5428.06) 4606.95,5424.52 4606.98,5424.28 4607,5424.14 ; 4607,5424.1 4607.99,5414.98
  Bottom Layer w10: D15.1@1629,3118.07 1630.98,3116.09 1630.98,3085.31 v1(1674.79,3041.5) ; v1(2248.03,3078.37) D16.1@2248.03,3207.26 ; v1(2996.06,3078.37) D17.1@2996.06,3207.26 ; v1(3744.05,3164.81) 3744.05,3207.22 D18.1@3744.09,3207.26 ; v2(4460,4940) 4460.91,4921.01 cw(c4440,4920) 4460.94,4920.03 4463.42,3317.48 ccw(c4473.42,3317.5) 4463.56,3315.87 4478.42,3225.88 D19.1@4492.13,3207.26 4492.13,3188.64 v1(4492.13,3164.81) ; v1(5240.16,3078.37) D20.1@5240.16,3207.26 ; D21.1@6327.15,3706.19 6327.15,3573.12 6486.9,3413.37 6486.9,3329.37 6420.9,3263.37 v1(6420.9,3073.37)
NetC5_2: C5.2 IC3.6 R21.1 | length 129.2
  Top Layer w10: C5.2@3935.87,5480 3935.87,5424.13 R21.1@3940,5420 3970,5420 3972.59,5417.41 3978.52,5417.41 v2(3980,5415.94)
  Bottom Layer w10: IC3.6@3975.87,5440 3980,5435.87 v2(3980,5415.94)
NetC8_1: C8.1 J5.2 | length 154.1
  Top Layer w6: v2(4459.65,5482.64) 4481.52,5482.64 4486.35,5487.47 4507.61,5487.47 J5.2@4507.87,5487.2
  Bottom Layer w6: v2(4459.65,5482.64) 4461.9,5480.39 4465.15,5480.39 cw(c4465.15,5474.39) 4466.35,5480.27 4472.54,5479.01 cw(c4471.34,5473.13) 4473.33,5478.79 4476.04,5477.84 cw(c4469.75,5459.98) 4486.15,5469.45 ccw(c4493.07,5473.47) 4487.97,5467.31 4496.46,5460.27 ccw(c4500.26,5464.92) 4500.26,5458.92 4518.28,5458.92 ccw(c4518.28,5464.92) 4522.52,5460.67 4537.79,5475.94 ccw(c4533.52,5480.16) 4538.26,5476.47 C8.1@4539.52,5486.07
NetC8_2: C8.2 J5.1 | length 72.5
  Top Layer w6: v2(4474.56,5502.46) 4476.78,5504.67 4505.66,5504.67 J5.1@4507.87,5506.89
  Bottom Layer w6: v2(4474.56,5502.46) 4487.42,5489.6 C8.2@4506.54,5489.6
NetC9_1: C9.1 J5.4 | length 156.7
  Top Layer w6: v2(4462.64,5433) 4465.81,5433 4473.92,5441.1 4477.71,5441.1 4484.44,5447.83 J5.4@4507.87,5447.83
  Bottom Layer w6: v2(4462.64,5433) 4463.55,5432.1 4477.53,5432.1 4494.19,5415.44 4497.89,5411.74 ccw(c4503.54,5417.4) 4503.54,5409.4 4527.17,5409.4 ccw(c4527.17,5417.4) 4532.92,5411.84 4541.19,5420.4 C9.1@4550,5430
NetC9_2: C9.2 J5.3 | length 99.2
  Top Layer w6: v2(4469.75,5459.98) 4479.24,5467.52 J5.3@4507.87,5467.52
  Bottom Layer w6: v2(4469.75,5459.98) 4484.59,5445.31 4490.31,5439.6 4506.54,5439.6 4515.35,5430.79 C9.2@4515.35,5430
NetC13_2: C13.2 L2.2 | length 99.2
  Top Layer w15: L2.2@5237.12,5270.59 ccw(c5177.5,5330.2) 5261.81,5330.2 5261.81,5363.19
NetC14_1: C14.1 IC7.29 Y1.1 | length 384.3
  Top Layer w10: C14.1@4568.85,5420.31 4563.98,5414.13 4566.02,5386.73 Y1.1@4584.65,5364.17 4603.27,5341.61 4622.24,5328.41 ccw(c4627.95,5336.61) 4625.69,5326.87 4677.46,5314.86 cw(c4675.2,5305.12) 4682.33,5312.13 4744.74,5248.6 ccw(c4759.67,5263.27) 4763.54,5242.69 4834.21,5255.99 ccw(c4832.36,5265.82) 4837,5256.96 4845.44,5261.38 IC7.29@4853.04,5269.03
NetC15_1: C15.1 IC7.30 Y1.3 | length 307.3
  Top Layer w10: C15.1@4640,5210 4641.63,5217.6 4641.63,5255 Y1.3@4651.57,5277.56 4670.2,5255 4748.39,5229.15 ccw(c4759.67,5263.27) 4766.31,5227.95 4849.27,5243.34 ccw(c4847.44,5253.17) 4852.08,5244.31 4860.52,5248.72 IC7.30@4868.12,5256.38
NetC16_2: C16.2 IC7.1 L2.1 | length 323.6
  Top Layer w10: IC7.1@4939.88,5234.71 4948.69,5228.49 4965.77,5214.49
  Top Layer w15: 4965.77,5214.49 4986.94,5193.32 ccw(c4997.49,5203.98) 4997.49,5188.98 5161.42,5188.98 ccw(c5161.42,5236.69) 5195.15,5202.95 C16.2@5199.36,5207.15 5210.89,5218.69 ccw(c5187.97,5241.61) L2.1@5220.39,5241.61
NetC17_2: C17.2 J5.13 | length 346
  Top Layer w10: v2(4477.63,5253.24) 4486.56,5263.47 cw(c4494.09,5256.89) 4490.29,5266.14 4499.09,5269.76 J5.13@4507.87,5270.67
  Bottom Layer w10: C17.2@4340,5471.02 4341.97,5471.02 4362.56,5450.43 4362.56,5448.46 4391.67,5419.36 4391.67,5293.14 4440.25,5244.56 4466.02,5244.56 4466.08,5244.62 cw(c4473.11,5237.51) 4466.87,5245.32 cw(c4473.14,5237.54) 4467.23,5245.6 v2(4477.63,5253.24)
NetC18_2: C18.2 C19.2 J5.14 | length 242
  Top Layer w10: v2(4485.84,5229.03) 4494.52,5240.86 ccw(c4477.63,5253.24) 4496.82,5244.87 4499.09,5250.08 J5.14@4507.87,5250.98
  Bottom Layer w10: C19.2@4339,5323 4349.42,5302.41 4373.57,5254.69 4381,5240 4410,5240 4428,5222 4476.72,5222 4483.75,5229.03 v2(4485.84,5229.03)